# Altium PCB PCB1.PcbDoc (part 1 of 3)
Units mm, origin at the board's own origin, x right, y up, seen from the top; angles counter-clockwise.
Board outline 115 x 52 mm, 2 copper layers (Top Layer, Bottom Layer); 184 components, 116 nets, 555 pads, 115 vias.
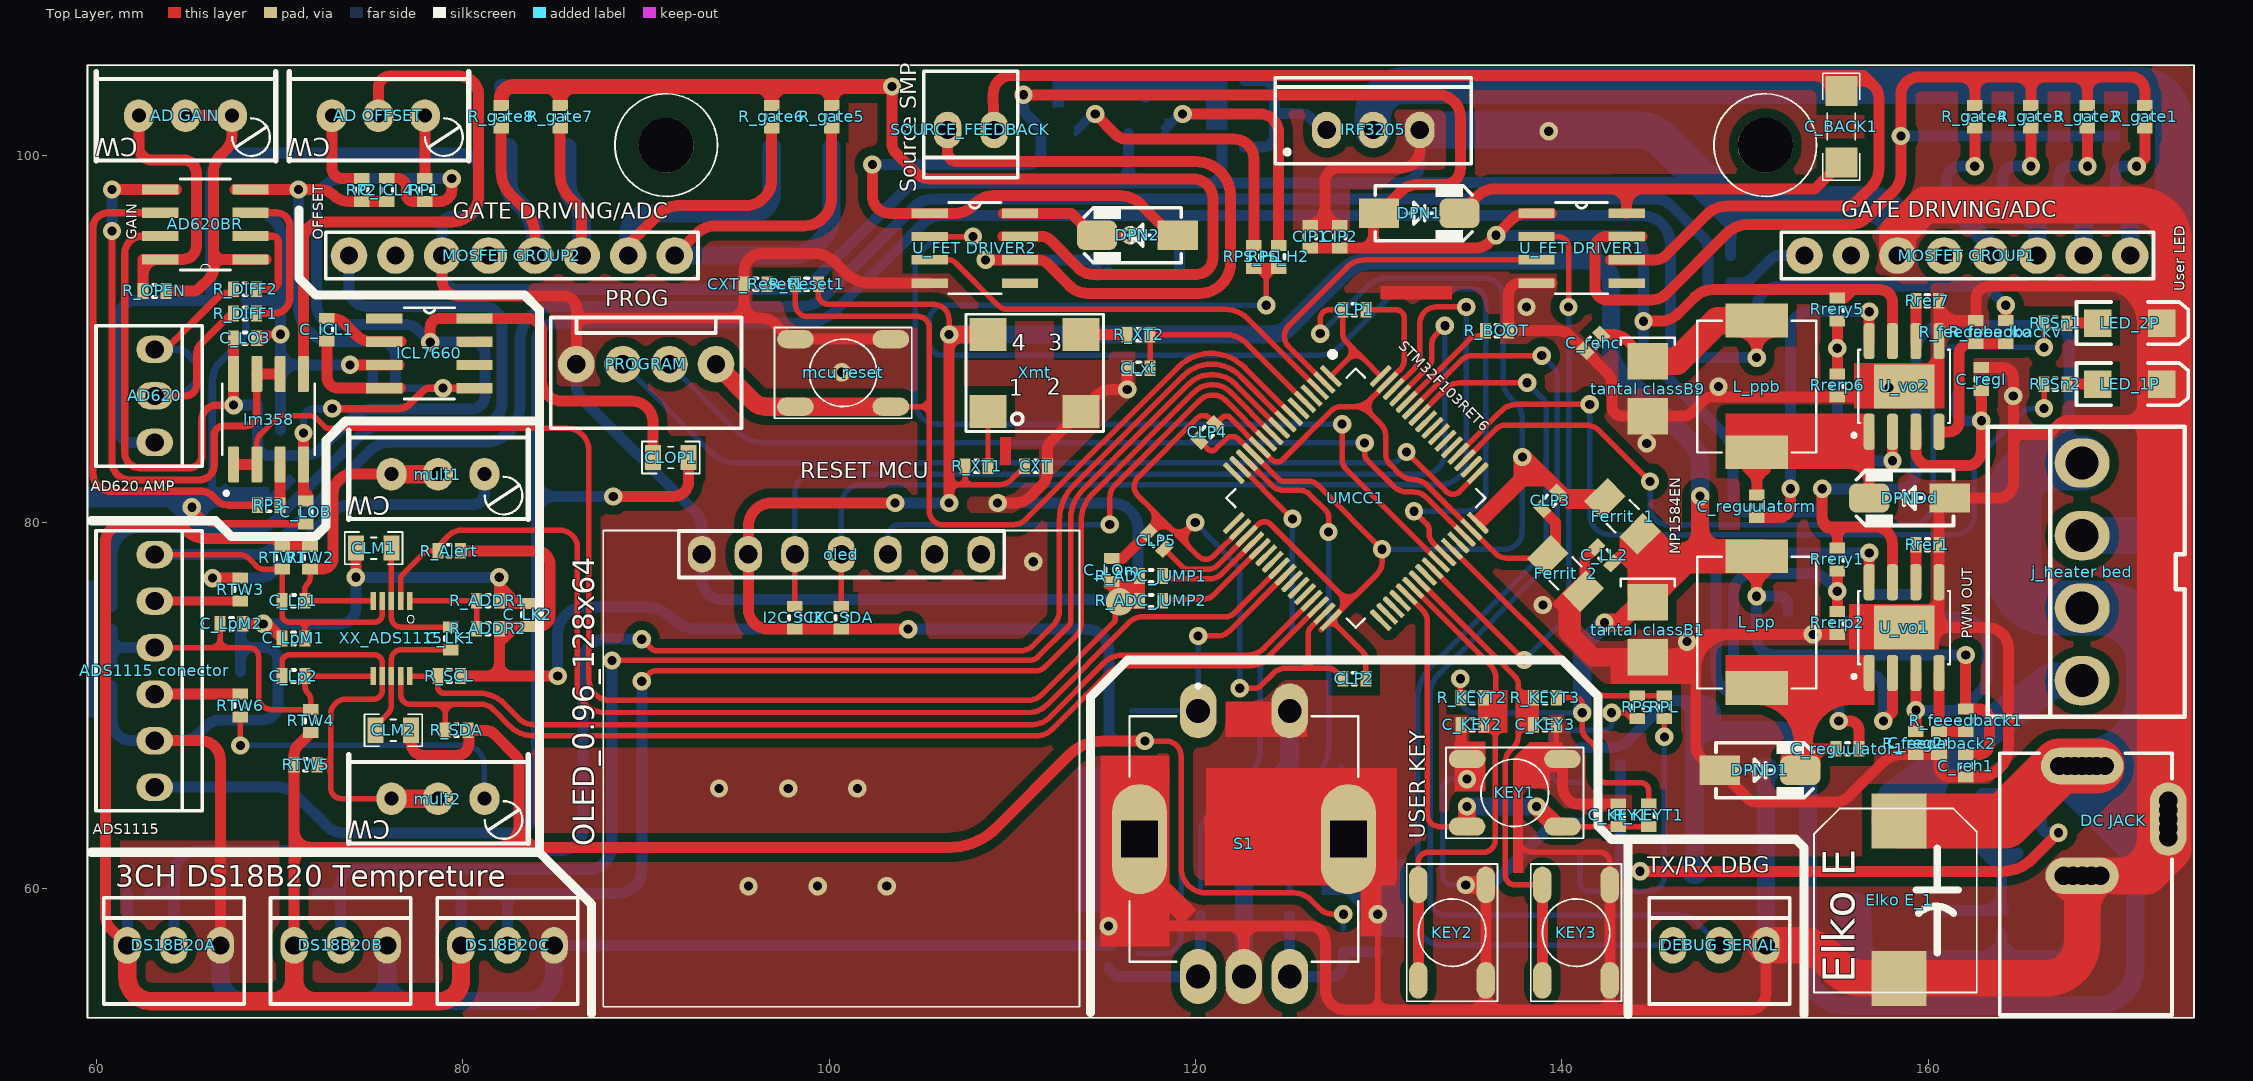
[diagram p0: Top Layer view]
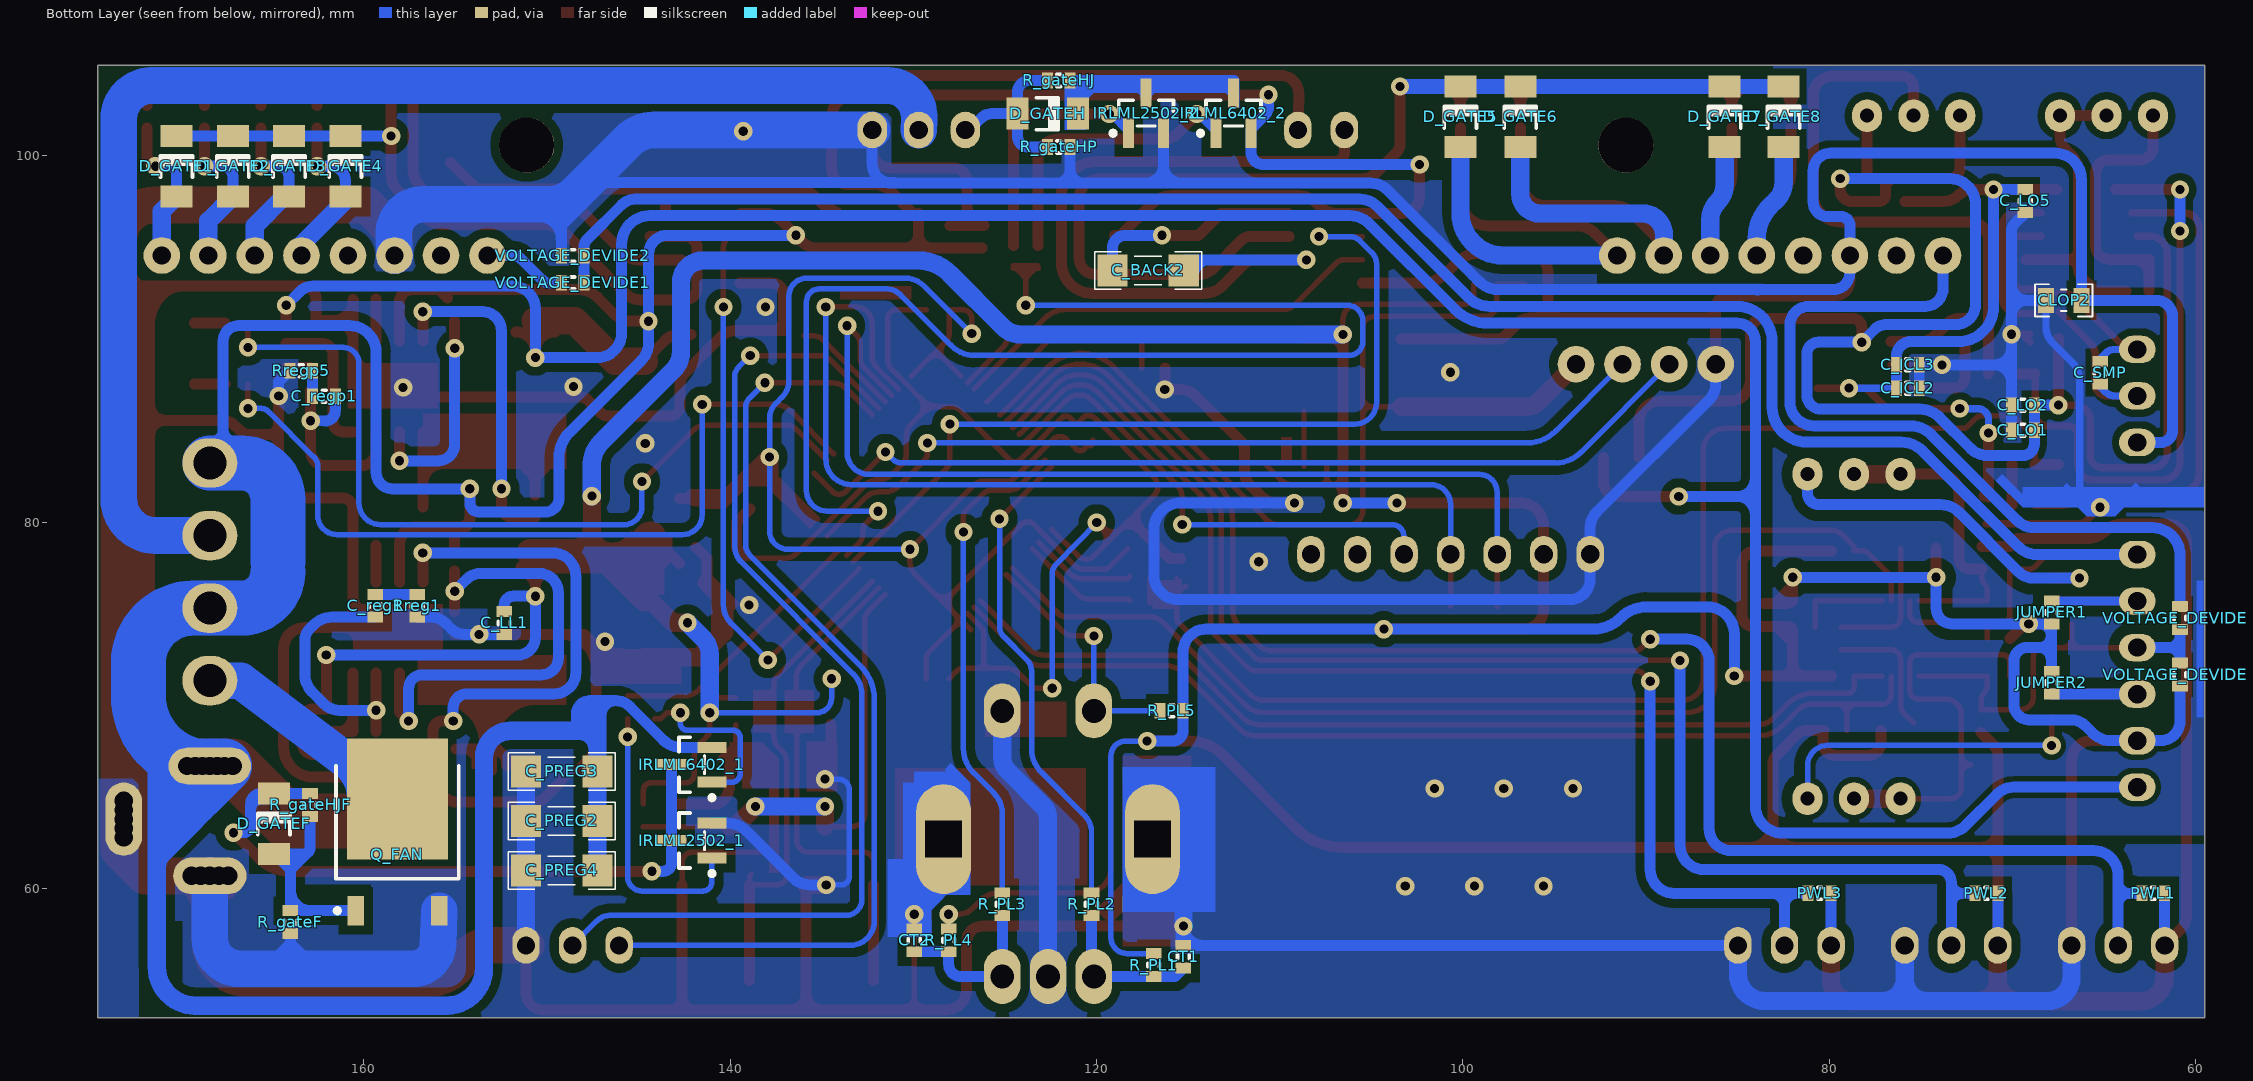
[diagram p1: Bottom Layer view, seen from below]
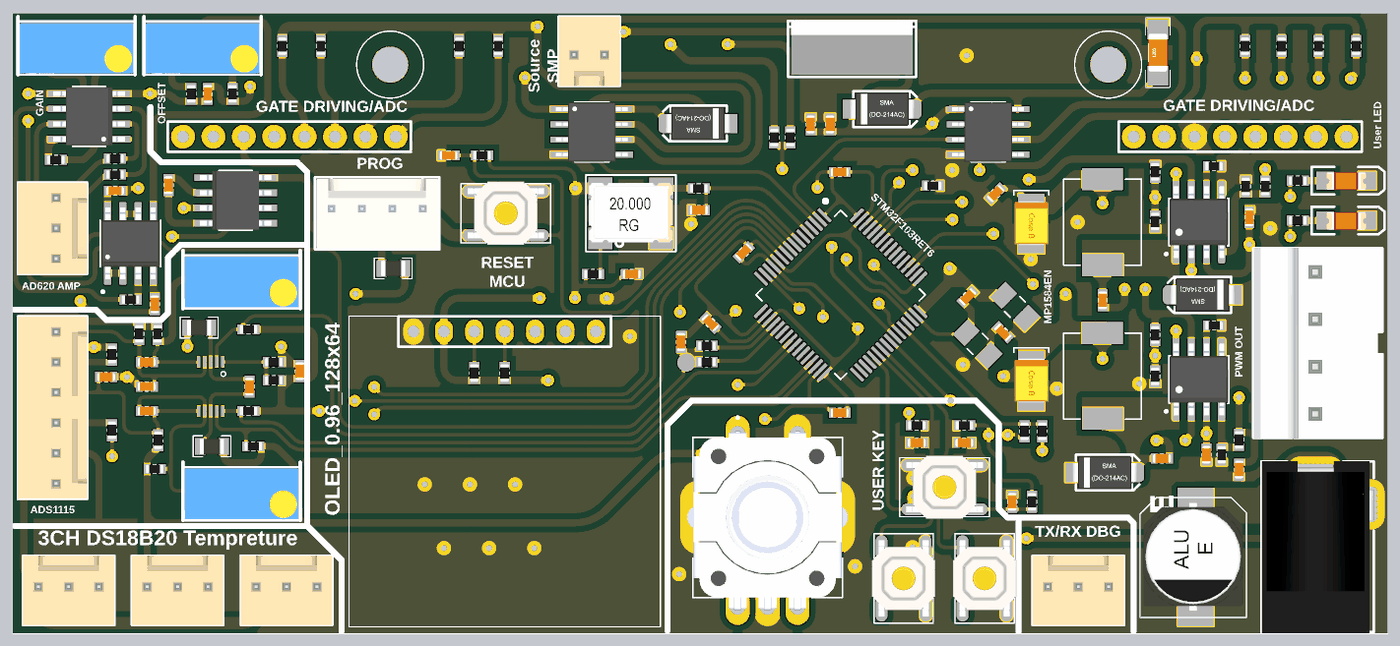
[diagram p4: 3D render of the assembled board from above, using the file's embedded part models]
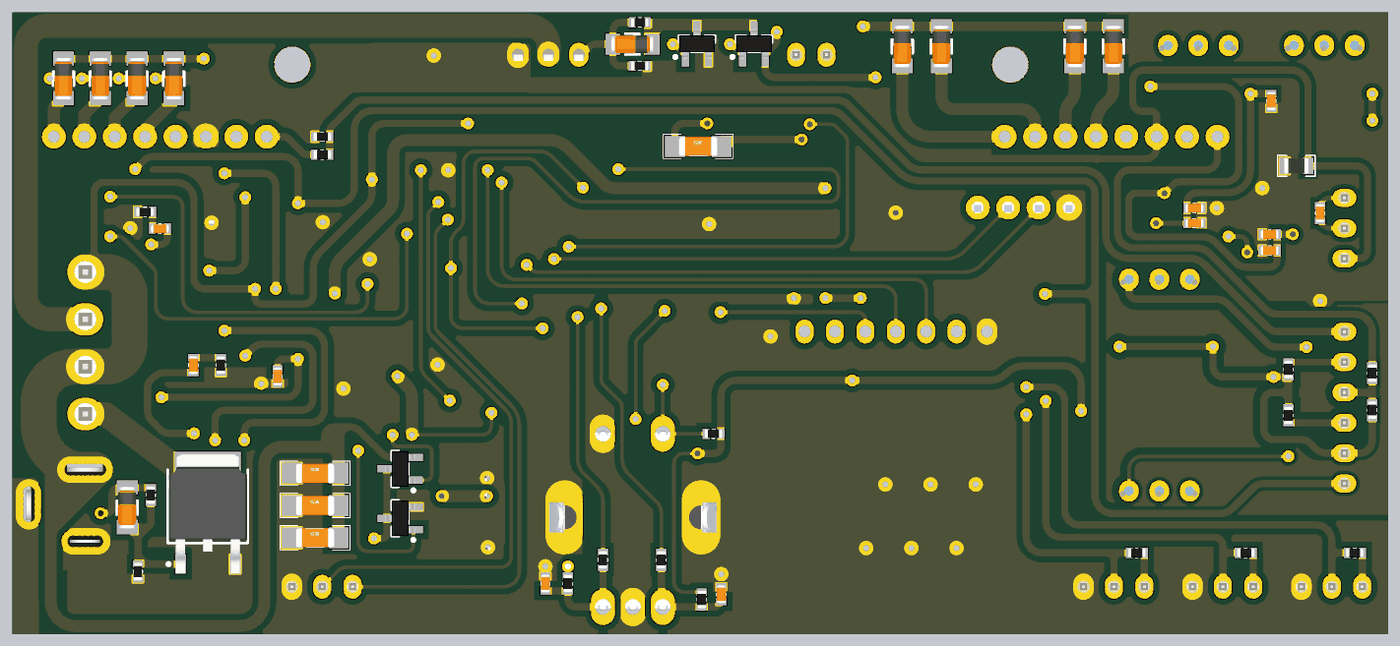
[diagram p5: 3D render of the assembled board from below, using the file's embedded part models]

## Layer stack, top to bottom
Top Solder: solder mask 0.0102, Solder Resist, Dk 3.5
Top Layer: signal copper 0.0356
Dielectric 1: dielectric 0.32, FR-4, Dk 4.8
Bottom Layer: signal copper 0.0356
Bottom Solder: solder mask 0.0102, Solder Resist, Dk 3.5

## Board outline
59.511,52.954 59.511,104.954 174.511,104.954 174.511,52.954

## Design rules (kind name [scope] priority, off if disabled: settings)
Clearance [All] p1: gap=0.1 ignorepadtopadclearanceinfootprint=FALSE
PolygonConnect [All] p1: connectstyle=Direct reliefconductorwidth=0.254 reliefentries=4 polygonreliefangle="90 Angle" airgapwidth=0.254
RoutingVias [All] p1: holewidth=0.5 width=1 viastyle="Through Hole" minholewidth=0.5 minwidth=1 maxholewidth=0.5 maxwidth=1
SolderMaskExpansion [All] p1: expansion=0.102 istentingtop=FALSE
Width [All] p1: maxlimit=3 minlimit=0.254 preferedwidth=0.5
30 further rules are at their usual default settings.

## Components (designator, comment, footprint, x,y, rotation, side; value= is the part's Value field where it differs from the comment)
AD620 "BUILER" 61900311121 63.179,86.9 r270 top
AD620BR "AD620BR" SOIC127P600X175-8N#1 65.95,96.26 r180 top
"AD GAIN" "100K" "Multi Turn" 64.86,102.2 r270 top
"AD OFFSET" "10K" "Multi Turn" 75.39,102.2 r270 top
"ADS1115 conector" "61900611121" 61900611121 63.179,71.894 r270 top
C_BACK1 "1uF" CAPC4817X12N 155.25,101.6 r90 top
C_BACK2 "1uF" CAPC4817X12N 117.18,93.75 r180 bottom
C_ICL1 "100nf" SMD_CAP_0603 72.58,90.513 r90 top value=10uF
C_ICL2 "100nf" SMD_CAP_0603 75.707,87.325 r180 bottom value=100nF
C_ICL3 "100nf" SMD_CAP_0603 75.707,88.595 r180 bottom value=10uF
C_ICL4 "100nf" SMD_CAP_0603 75.86,98.141 r270 top value=100nF
C_KEY1 "100nf" SMD_CAP_0603 143.08,64.016 r90 top value=100nF
C_KEY2 "100nf" SMD_CAP_0603 135.11,68.96 r180 top value=100nF
C_KEY3 "100nf" SMD_CAP_0603 139.078,68.96 r0 top value=100nF
C_LK1 "100nf" SMD_CAP_0603 79.344,73.661 r270 top value=100nF
C_LK2 "100nf" SMD_CAP_0603 83.55,74.948 r270 top value=100nF
C_LL1 "100nf" SMD_CAP_0603 152.33,74.508 r270 bottom value=100nF
C_LL2 "100nf" SMD_CAP_0603 142.31,78.2 r135 top value=1uF
C_LO1 "100nf" SMD_CAP_0603 69.428,85.039 r0 bottom value=100nF
C_LO2 "100nf" SMD_CAP_0603 69.428,86.399 r0 bottom value=10uF
C_LO3 "100nf" SMD_CAP_0603 68.112,90.04 r0 top value=10uF
C_LO5 "100nf" SMD_CAP_0603 69.295,97.543 r270 bottom value=100NF
C_LOB "100nf" SMD_CAP_0603 71.43,80.544 r270 top value=100nF
C_LOm "100nf" SMD_CAP_0603 115.414,77.394 r90 top value=100nF
C_Lp1 "100nf" SMD_CAP_0603 70.758,75.711 r0 top value=100nF
C_Lp2 "100nf" SMD_CAP_0603 70.758,71.611 r180 top value=100nF
C_LpM1 "100nf" SMD_CAP_0603 70.758,73.66 r0 top value=100nF
C_LpM2 "100nf" SMD_CAP_0603 67.37,74.46 r180 top value=100nF
C_PREG2 "10uF" CAPC4817X12N 149.19,63.7 r180 bottom
C_PREG3 "1uF" CAPC4817X12N 149.19,66.4 r180 bottom
C_PREG4 "100nF" CAPC4817X12N 149.19,61 r180 bottom
C_reg1 "100nf" SMD_CAP_0603 159.37,75.45 r90 bottom value=220pf
C_reg2 "NS" SMD_CAP_0603 159.315,67.954 r270 top
C_regl "NS" SMD_CAP_0603 162.899,87.82 r90 top
C_regp1 "100nf" SMD_CAP_0603 162.16,86.88 r0 bottom value=220pf
C_reguulator1 "22uf/6.3v" SMD_CAP_0603 155.591,67.638 r0 top value=100nf
C_reguulatorm "22uf/6.3v" SMD_CAP_0603 150.64,80.881 r270 top value=100nf
C_reh1 "22uf/6.3v" SMD_CAP_0603 162.04,66.71 r270 top
C_rehc "22uf/6.3v" SMD_CAP_0603 141.7,89.81 r225 top
C_SMP "10nf" SMD_CAP_0603 65.208,88.17 r90 bottom value=10nF
CIP1 "100nf" SMD_CAP_0603 126.25,95.592 r90 top value=100nF
CIP2 "100nf" SMD_CAP_0603 127.86,95.592 r90 top value=100nF
CLM1 "10uH" IND0805 75.134,78.59 r180 top value=1u
CLM2 "10uH" IND0805 76.21,68.65 r0 top value=1u
CLOP1 "10uH" IND0805 91.36,83.54 r0 top value=1u
CLOP2 "10uH" IND0805 67.2,92.12 r180 bottom value=1u
CLP1 "100nf" SMD_CAP_0603 128.67,91.61 r0 top value=100nF
CLP2 "100nf" SMD_CAP_0603 128.67,71.46 r180 top value=100nF
CLP3 "100nf" SMD_CAP_0603 139.359,81.173 r225 top value=100nF
CLP4 "100nf" SMD_CAP_0603 120.65,84.91 r45 top value=100nF
CLP5 "100nf" SMD_CAP_0603 117.86,78.99 r135 top value=100nF
CLxt "100nf" SMD_CAP_0603 116.892,88.414 r180 top value=10pF
CT1 "100nf" SMD_CAP_0603 115.25,56.283 r90 bottom value=100nF
CT2 "100nf" SMD_CAP_0603 129.95,57.182 r270 bottom value=100nF
CXT "100nf" SMD_CAP_0603 111.288,83.06 r0 top value=100nF
CXT_Reset1 "100nf" SMD_CAP_0603 95.984,93 r180 top value=100nF
D_GATE1 "1N4148" "Diode 1n4148 SMD" 170.219,97.79 r90 bottom
D_GATE2 "1N4148" "Diode 1n4148 SMD" 167.145,97.79 r90 bottom
D_GATE3 "1N4148" "Diode 1n4148 SMD" 164.072,97.79 r90 bottom
D_GATE4 "1N4148" "Diode 1n4148 SMD" 160.999,97.79 r90 bottom
D_GATE5 "1N4148" "Diode 1n4148 SMD" 100.13,100.49 r90 bottom
D_GATE6 "1N4148" "Diode 1n4148 SMD" 96.86,100.49 r90 bottom
D_GATE7 "1N4148" "Diode 1n4148 SMD" 85.71,100.49 r90 bottom
D_GATE8 "1N4148" "Diode 1n4148 SMD" 82.49,100.49 r90 bottom
D_GATEF "1N4148" "Diode 1n4148 SMD" 164.9,61.9 r90 bottom
D_GATEH "1N4148" "Diode 1n4148 SMD" 124.31,102.308 r180 bottom
"DC JACK" "DC Power Jack" "DC Power Jack 1" 167.6,66.7 r90 top
"DEBUG SERIAL" "BUILER" 61900311121 148.6,56.906 r0 top
DPN1 "1N5819" 430X270D 132.21,96.87 r0 top
DPN2 "1N5819" 430X270D 116.82,95.67 r180 top
DPND1 "1N5819" 430X270D 150.81,66.46 r0 top
DPNDd "1N5819" 430X270D 158.975,81.33 r180 top
DS18B20A "HEATSINK1" 61900311121 64.231,56.906 r0 top
DS18B20B "HEATSINK2" 61900311121 73.336,56.906 r0 top
DS18B20C "BUILER" 61900311121 82.441,56.906 r0 top
"Elko E_1" "Elko E package" "Elko E" 158.2,56.5 r90 top
"Ferrit  1" "BLM31PG601SH1L" BEADC3216X130N 143.312,80.328 r315 top
"Ferrit  2" "BLM31PG601SH1L" BEADC3216X130N 140.196,77.212 r315 top
"I2C SCK" "4.7K" "RES 0603 (1608X06L)" 98.13,75.417 r270 top
"I2C SDA" "4.7K" "RES 0603 (1608X06L)" 100.67,75.417 r270 top
ICL7660 "ICL7660CBAZ" SOIC127P600X175-8N#2 78.18,89.23 r0 top
IRF3205 "IRF740" "TO-220 AB" 129.7,101.418 r0 top
IRLML2502_1 "BC337" SOT23_M 142.09,62.63 r0 bottom
IRLML2502_2 "BC337" SOT23_M 117.29,102.34 r90 bottom
IRLML6402_1 "BC856" SOT23_M 142.09,66.77 r0 bottom
IRLML6402_2 "BC856" SOT23_M 112.52,102.34 r90 bottom
"j_heater bed" "" 645004114822 168.4,77.3 r90 top
JUMPER1 "0R" "RES 0603 (1608X06L)" 67.86,74.46 r90 bottom
JUMPER2 "0R" "RES 0603 (1608X06L)" 67.86,71.869 r270 bottom
KEY1 "RTC_PWR" push_bt 140.029,63.394 r180 top
KEY2 "RTC_PWR" push_bt 132.161,55 r90 top
KEY3 "RTC_PWR" push_bt 138.929,55 r90 top
L_pp "10uH" IND_SRP6540-4R7M#1 150.63,74.53 r90 top
L_ppb "10uH" IND_SRP6540-4R7M#2 150.63,87.41 r90 top
LED_1P "" "LED SMD 1206" 170.99,87.55 r0 top
LED_2P "" "LED SMD 1206" 170.99,90.88 r0 top
lm358 "LM358D" SOIC127P599X175-8N 69.395,85.63 r90 top
"mcu reset" "RTC_PWR" push_bt 103.367,86.317 r180 top
"MOSFET GROUP1" "Header 8" HDR1X8 171.019,94.564 r180 top
"MOSFET GROUP2" "Header 8" HDR1X8 91.569,94.564 r180 top
mult1 "500 ohm" "Multi Turn" 78.644,82.63 r270 top
mult2 "500 ohm" "Multi Turn" 78.644,64.92 r270 top
oled "Header 7" HDR1X7 93.05,78.26 r0 top
PROGRAM "HDR_STEPER MOTOR" "CON WF_4" 90.01,88.635 r180 top
PWL1 "4.7K" "RES 0603 (1608X06L)" 61.691,59.746 r0 bottom
PWL2 "4.7K" "RES 0603 (1608X06L)" 70.796,59.746 r0 bottom
PWL3 "4.7K" "RES 0603 (1608X06L)" 79.901,59.746 r0 bottom
Q_FAN "FDD6690A" TO252-3L 158.16,63.1 r90 bottom
R_ADC_JUMP1 "10R" "RES 0603 (1608X06L)" 116.946,77.07 r0 top
R_ADC_JUMP2 "10R" "RES 0603 (1608X06L)" 116.946,75.71 r0 top
R_ADDR1 "4.7K" "RES 0603 (1608X06L)" 81.994,75.711 r180 top
R_ADDR2 "4.7K" "RES 0603 (1608X06L)" 81.994,74.18 r180 top
R_Alert "10K" "RES 0603 (1608X06L)" 78.639,78.444 r0 top
R_BOOT "10K" "RES 0603 (1608X06L)" 135.83,90.46 r0 top
R_DIFF1 "1K" "RES 0603 (1608X06L)" 67.49,91.4 r0 top
R_DIFF2 "1K" "RES 0603 (1608X06L)" 67.49,92.73 r0 top
R_feedaback2 "40.2K" "RES 0603 (1608X06L)" 160.585,68.576 r270 top
R_feedabacko "40.2K" "RES 0603 (1608X06L)" 162.599,89.771 r90 top
R_feeedback1 "124K" "RES 0603 (1608X06L)" 162.04,69.821 r270 top
R_feeedbackv "124K" "RES 0603 (1608X06L)" 164.229,91.015 r270 top
R_gate1 "10R" "RES 0603 (1608X06L)" 171.819,101.518 r90 top
R_gate2 "10R" "RES 0603 (1608X06L)" 168.685,101.518 r90 top
R_gate3 "10R" "RES 0603 (1608X06L)" 165.602,101.518 r90 top
R_gate4 "10R" "RES 0603 (1608X06L)" 162.539,101.518 r90 top
R_gate5 "10R" "RES 0603 (1608X06L)" 100.13,101.518 r90 top
R_gate6 "10R" "RES 0603 (1608X06L)" 96.86,101.518 r90 top
R_gate7 "10R" "RES 0603 (1608X06L)" 85.31,101.518 r90 top
R_gate8 "10R" "RES 0603 (1608X06L)" 82.09,101.518 r90 top
R_gateF "10K" "RES 0603 (1608X06L)" 164,58.8 r270 bottom
R_gateHJ "10R" "RES 0603 (1608X06L)" 122.682,104.12 r180 bottom
R_gateHJF "10R" "RES 0603 (1608X06L)" 162.93,63.956 r90 bottom
R_gateHP "10K" "RES 0603 (1608X06L)" 122.682,100.49 r180 bottom
R_KEYT1 "4.7K" "RES 0603 (1608X06L)" 144.73,63.394 r90 top
R_KEYT2 "4.7K" "RES 0603 (1608X06L)" 135.732,70.42 r180 top
R_KEYT3 "4.7K" "RES 0603 (1608X06L)" 138.456,70.42 r0 top
R_OPEN "?" "RES 0603 (1608X06L)" 62.546,92.63 r0 top
R_PL1 "4.7K" "RES 0603 (1608X06L)" 116.88,56.454 r270 bottom
R_PL2 "4.7K" "RES 0603 (1608X06L)" 120.27,58.536 r90 bottom
R_PL3 "4.7K" "RES 0603 (1608X06L)" 125.14,58.536 r90 bottom
R_PL4 "4.7K" "RES 0603 (1608X06L)" 128.07,57.804 r270 bottom
R_PL5 "4.7K" "RES 0603 (1608X06L)" 115.276,69.71 r0 bottom
R_Reset1 "4.7K" "RES 0603 (1608X06L)" 98.16,93 r0 top
R_SCL "4.7K" "RES 0603 (1608X06L)" 79.883,71.611 r180 top
R_SDA "4.7K" "RES 0603 (1608X06L)" 80.283,68.65 r180 top
R_XT1 "10k" "RES 0603 (1608X06L)" 107.426,83.06 r0 top
R_XT2 "100R" "RES 0603 (1608X06L)" 116.27,90.25 r0 top
RP1 "1K" "RES 0603 (1608X06L)" 77.93,98.763 r270 top
RP2 "1K" "RES 0603 (1608X06L)" 74.479,98.763 r270 top
RP3 "1K" "RES 0603 (1608X06L)" 70.03,80.935 r180 top
RPL "1K" "RES 0603 (1608X06L)" 145.59,70.53 r270 top
RPS "1K" "RES 0603 (1608X06L)" 144.11,70.53 r270 top
RPS_H1 "1K" "RES 0603 (1608X06L)" 123.188,93.87 r90 top
RPS_H2 "1K" "RES 0603 (1608X06L)" 124.53,93.87 r90 top
RPSn1 "1K" "RES 0603 (1608X06L)" 167.56,90.88 r180 top
RPSn2 "1K" "RES 0603 (1608X06L)" 167.56,87.55 r180 top
Rreg1 "68.1K" "RES 0603 (1608X06L)" 157.07,76.072 r270 bottom
Rregp5 "68.1K" "RES 0603 (1608X06L)" 162.782,88.28 r0 bottom
Rrer1 "200K" "RES 0603 (1608X06L)" 159.331,78.77 r0 top
Rrer7 "200K" "RES 0603 (1608X06L)" 159.325,92.1 r0 top
Rrerp2 "24.9K" "RES 0603 (1608X06L)" 155.03,73.886 r90 top
Rrerp6 "24.9K" "RES 0603 (1608X06L)" 155.03,86.856 r90 top
Rrery1 "100K" "RES 0603 (1608X06L)" 155.03,78.594 r270 top
Rrery5 "100K" "RES 0603 (1608X06L)" 155.03,92.244 r270 top
RTW1 "1K" "RES 0603 (1608X06L)" 70.136,78.685 r270 top
RTW2 "1K" "RES 0603 (1608X06L)" 71.66,77.441 r90 top
RTW3 "820R" "RES 0603 (1608X06L)" 67.86,76.955 r270 top
RTW4 "1K" "RES 0603 (1608X06L)" 71.71,68.536 r90 top
RTW5 "1K" "RES 0603 (1608X06L)" 72.04,66.76 r180 top
RTW6 "820R" "RES 0603 (1608X06L)" 67.86,69.38 r90 top
S1 "PEC11R-4220K-S0024" XDCR_PEC11R-4220K-S0024 122.64,62.71 r0 top
SOURCE_FEEDBACK "61900211121" 61900211121 107.73,101.418 r180 top
"tantal classB1" "100uf/16" "TANTAL-CAP-Size B" 144.68,74.135 r270 top
"tantal classB9" "100uf/16" "TANTAL-CAP-Size B" 144.68,87.3 r270 top
"U_FET DRIVER1" "IR2104STRPBF" SOIC127P600X175-8N#3 141.07,94.965 r0 top
"U_FET DRIVER2" "IR2104STRPBF" SOIC127P600X175-8N#3 107.95,94.965 r0 top
U_vo1 "MP1584EN" SOIC127P600X170-9N 158.68,74.255 r90 top
U_vo2 "MP1584EN" SOIC127P600X170-9N 158.68,87.42 r90 top
UMCC1 "STM32F103RET6" QFP50P1200X1200X160-64N 128.749,81.325 r315 top
VOLTAGE_DEVIDE1 "?R" "RES 0603 (1608X06L)" 149.214,93.07 r180 bottom
VOLTAGE_DEVIDE2 "?R" "RES 0603 (1608X06L)" 149.214,94.564 r180 bottom
VOLTAGE_DEVIDE3 "?R" "RES 0603 (1608X06L)" 60.85,75.4 r270 bottom
VOLTAGE_DEVIDE4 "?R" "RES 0603 (1608X06L)" 60.85,71.066 r90 bottom
Xmt "NZ2520SB-25.00M" VCO 108.67,86.059 r0 top
XX_ADS1115 "XX_ADS1115" MSOP10 76.104,73.661 r180 top

## Footprints (in the part's own frame and the unit in brackets; to place one, negate y for a bottom-side part, rotate by r counter-clockwise, add the part's x,y. Pads: shape width x height; smd on the part's side, far side on the other; paste and mask are expansions set on the pad)
430X270D [mm] "SMA Molded Diode, 2-Leads, Body 4.3x2.7mm"
  rect 2.2x1.6 smd: 1(-2.2,0)
  rrect50% 2.2x1.6 smd: 2(2.2,0)
  silkscreen extent -2.4,-1.5 2.9,1.5, body extent -2.75,-1.4 2.75,1.4, height 2.6
61900211121 [mm] "2.54mm Male Locking Header, 2p"
  oval 1.5x2 hole 1: 1(1.27,0) 2(-1.27,0)
  silkscreen extent -2.56,-3.2 2.56,2.6, body extent -2.54,-3.2 2.54,2.6, height 11.55
61900311121 [mm] "2.54mm Male Locking Header, 3p"
  oval 1.5x2 hole 1: 1(2.54,0) 2(0,0) 3(-2.54,0)
  silkscreen extent -3.83,-3.2 3.83,2.6, body extent -3.81,-3.2 3.81,2.6, height 11.55
61900611121 [mm] "2.54mm Male Locking Header, 6p"
  oval 1.5x2 hole 1: 1(6.35,0) 2(3.81,0) 3(1.27,0) 4(-1.27,0) 5(-3.81,0) 6(-6.35,0)
  silkscreen extent -7.64,-3.2 7.64,2.6, body extent -7.62,-3.2 7.62,2.6, height 11.55
645004114822 [mm] "3.96mm Male Locking Header, 4p"
  oval 2.7x3 hole 1.8: 1(5.94,0) 2(1.98,0) 3(-1.98,0) 4(-5.94,0)
  silkscreen extent -7.92,-5.6 7.92,5.15, body extent -7.98,-5.6 7.98,5.15, height 13.95
BEADC3216X130N [mm]
  rect 1.4x1.82 smd: 1(-1.36,0) 2(1.36,0)
  silkscreen extent -0.34,-0.9 0.34,0.9
CAPC4817X12N [mm] "Chip Capacitor, 2-Leads, Body 4/80x1/70mm, IPC Medium Density-Design:Abbas Basereh"
  rect 1.65x1.75 smd: 1(-1.95,0) 2(1.95,0)
  silkscreen extent -2.92,-1.02 2.92,1.02, body extent -1.6,-0.8 1.6,0.8, height 1
"CON WF_4" [mm] "DS1070  WF, Cvilux CI31 pitch 2.54mm-Designer Abbas Basereh"
  round 2 hole 1: 1(-3.81,0) 2(-1.27,0) 3(1.27,0) 4(3.81,0)
  silkscreen extent -5.2,-2.55 5.2,3.5, body extent -5.08,-2.4 5.08,3.4, height 11.56
"DC Power Jack 1" [mm] "Power Adaptor Jack"
  round 1.5 hole 1: 1(0,0.45) 1(0,0) 1(0,-0.4) 1(0,-1.2) 1(0,-1.6) 1(0,-2.05) 2(-6,-1.8) 2(-6,0.2) 2(-6,-1.3) 2(-6,-0.3) 3(-3.9,-5.5) 3(-3.4,-5.5) 3(-2.4,-5.5) 3(-1.9,-5.5)
  oval 2x4.5 hole 1: 1(0,-0.8)
  oval 2x4 hole 1: 2(-6,-0.8)
  oval 4x2 hole 1: 3(-2.9,-5.5)
  silkscreen extent -13.59,-5.7 0.7,3.7, body extent -13.68,-5.74 0.72,3.66, height 11.05
"Diode 1n4148 SMD" [mm] "Mini MELF SOD-80"
  rect 1.2x1.75 smd: 1(0,0) 2(3.3,0)
  silkscreen extent 1.04,-0.88 2.22,0.87, body extent -0.13,-0.75 3.37,0.75, height 1.55
"Elko E" [mm]
  rect 3x3 smd: 1(-1.395,-0.21) 2(7.2,-0.2)
  silkscreen extent -2.16,-4.44 7.87,4.45, body extent -1.58,-4.15 7.42,4.15, height 6.2
HDR1X7 [mm] "Connector; Header; 7 Position"
  oval 1.5x2 hole 1: 1(0,0) 2(2.54,0) 3(5.08,0) 4(7.62,0) 5(10.16,0) 6(12.7,0) 7(15.24,0)
  silkscreen extent -1.27,-1.27 16.51,1.27
HDR1X8 [mm] "Connector; Header; 8 Position"
  round 2 hole 1: 1(0,0) 2(2.54,0) 3(5.08,0) 4(7.62,0) 5(10.16,0) 6(12.7,0) 7(15.24,0) 8(17.78,0)
  silkscreen extent -1.27,-1.27 19.05,1.27
IND0805 [mm] "Chip Inductor, 2-Leads, Body 2/00x1/25mm, IPC Medium Density DESIGNER:ABBAS BASEREH"
  rect 0.87x1.37 smd: 1(-0.97,0) 2(0.97,0)
  silkscreen extent -1.58,-0.87 1.58,0.87, body extent -1.02,-0.65 1.02,0.65, height 0.5
IND_SRP6540-4R7M#1 [mm]
  rect 1.85x3.4 smd: 1(-3.57,-0.01) 2(3.62,0)
  silkscreen extent -3.6,-3.25 3.6,3.25
IND_SRP6540-4R7M#2 [mm]
  rect 1.85x3.4 smd: 1(-3.585,0) 2(3.605,0)
  silkscreen extent -3.6,-3.25 3.6,3.25
"LED SMD 1206" [mm]
  rect 1.5x1.5 smd: 1(-1.75,0) 2(1.75,0)
  silkscreen extent -2.9,-1.15 3.2,1.15, body extent -1.65,-0.76 1.65,0.69, height 1.36
MSOP10 [mm]
  rect 0.3x1 smd paste-1 mask+0: 1(-1,-2.05) 2(-0.5,-2.05) 3(0,-2.05) 4(0.5,-2.05) 5(1,-2.05) 6(1,2.05) 7(0.5,2.05) 8(0,2.05) 9(-0.5,2.05) 10(-1,2.05)
  silkscreen extent -1.25,-1.25 -0.85,-0.85
"Multi Turn" [mil]
  oval 70x65 hole 30: 1(0,100) 2(0,0) 3(0,-100)
  silkscreen extent -94,-191 96,194, body extent -73,-185 93,189, height 452
push_bt [mm]
  oval 2x1 smd: 1(0,0) 2(0,-3.683) 3(5.207,0) 4(5.207,-3.683)
  silkscreen extent -1.14,-4.32 6.35,0.64, body extent -0.6,-4.49 5.8,0.81, height 1.5
QFP50P1200X1200X160-64N [mm]
  rrect50% 1.49x0.28 smd: 1(-5.67,3.75) 2(-5.67,3.25) 3(-5.67,2.75) 4(-5.67,2.25) 5(-5.67,1.75) 6(-5.67,1.25) 7(-5.67,0.75) 8(-5.67,0.25) 9(-5.67,-0.25) 10(-5.67,-0.75) 11(-5.67,-1.25) 12(-5.67,-1.75) 13(-5.67,-2.25) 14(-5.67,-2.75) 15(-5.67,-3.25) 16(-5.67,-3.75) 33(5.67,-3.75) 34(5.67,-3.25) 35(5.67,-2.75) 36(5.67,-2.25) 37(5.67,-1.75) 38(5.67,-1.25) 39(5.67,-0.75) 40(5.67,-0.25) 41(5.67,0.25) 42(5.67,0.75) 43(5.67,1.25) 44(5.67,1.75) 45(5.67,2.25) 46(5.67,2.75) 47(5.67,3.25) 48(5.67,3.75)
  rrect50% 0.28x1.49 smd: 17(-3.75,-5.67) 18(-3.25,-5.67) 19(-2.75,-5.67) 20(-2.25,-5.67) 21(-1.75,-5.67) 22(-1.25,-5.67) 23(-0.75,-5.67) 24(-0.25,-5.67) 25(0.25,-5.67) 26(0.75,-5.67) 27(1.25,-5.67) 28(1.75,-5.67) 29(2.25,-5.67) 30(2.75,-5.67) 31(3.25,-5.67) 32(3.75,-5.67) 49(3.75,5.67) 50(3.25,5.67) 51(2.75,5.67) 52(2.25,5.67) 53(1.75,5.67) 54(1.25,5.67) 55(0.75,5.67) 56(0.25,5.67) 57(-0.25,5.67) 58(-0.75,5.67) 59(-1.25,5.67) 60(-1.75,5.67) 61(-2.25,5.67) 62(-2.75,5.67) 63(-3.25,5.67) 64(-3.75,5.67)
  silkscreen extent -6.6,-5 5,5
"RES 0603 (1608X06L)" [mm] "Chip Resistor, 2-Leads, Body 1.6x0.8mm, IPC High Density _ (0.063W)"
  rect 0.6x0.85 smd: 1(0,0) 2(1.244,0)
  silkscreen extent 0.52,-0.33 0.72,0.33, body extent -0.14,-0.38 1.38,0.38, height 0.45
SMD_CAP_0603 [mm]
  rect 0.6x0.85 smd: 1(-0.622,0) 2(0.622,0)
  silkscreen extent -0.1,-0.33 0.1,0.33, body extent -0.76,-0.38 0.76,0.38, height 0.6
SOIC127P599X175-8N [mm]
  rrect25% 1.97x0.6 smd: 1(-2.47,1.905) 2(-2.47,0.635) 3(-2.47,-0.635) 4(-2.47,-1.905) 5(2.47,-1.905) 6(2.47,-0.635) 7(2.47,0.635) 8(2.47,1.905)
  silkscreen extent -4.14,-2.52 1.95,2.52, body extent -3,-2.45 3,2.45, height 1.75
SOIC127P600X170-9N [mm]
  rrect54% 1.97x0.6 smd paste+0 mask+0.102: 1(-2.475,1.905) 2(-2.475,0.635) 3(-2.475,-0.635) 4(-2.475,-1.905) 5(2.475,-1.905) 6(2.475,-0.635) 7(2.475,0.635) 8(2.475,1.905)
  rect 2.41x3.3 smd paste-3 mask+0.102: 9(0,0)
  silkscreen extent -2.77,-2.5 2,2.84, body extent -3,-2.45 3,2.45, height 1.7
SOIC127P600X175-8N#1 [mil]
  rect 78x22 smd: 1(-97,75) 2(-97,25) 3(-97,-25) 4(-97,-75) 5(97,-75) 6(97,-25) 7(97,25) 8(97,75)
  silkscreen extent -54,-98 54,98, body extent -118,-96 118,96, height 69
SOIC127P600X175-8N#2 [mil]
  rect 78x22 smd paste+0 mask+4.02: 1(-97,75) 2(-97,25) 3(-97,-25) 4(-97,-75) 5(97,-75) 6(97,-25) 7(97,25) 8(97,75)
  silkscreen extent -54,-98 54,98, body extent -118,-96 118,96, height 69
SOIC127P600X175-8N#3 [mil]
  rect 78x20 smd: 1(-97,75) 2(-97,25) 3(-97,-25) 4(-97,-75) 5(97,-75) 6(97,-25) 7(97,25) 8(97,75)
  silkscreen extent -56,-98 56,98, body extent -118,-98 118,98, height 69
SOT23_M [mm] "SOT23, 3-Leads, Body 2.9x1.3mm, Pitch 0.95mm, Lead Span 2.3mm, IPC Low Density"
  rect 1.6x0.6 smd: 1(-1.1,0.95) 2(-1.1,-0.95) 3(1.1,0)
  silkscreen extent -1.22,-1.5 0.7,1.92, body extent -1.27,-1.5 1.27,1.5, height 1.1
"TANTAL-CAP-Size B" [mm] "Chip Capacitor, 2-Leads, Body 3.2x1.6mm, IPC High Density, chip Tantalum"
  rect 2x2.2 smd: 1(1.5,0) 2(-1.5,0)
  silkscreen extent -2.78,-1.47 -2.38,1.47, body extent -1.87,-1.39 1.82,1.43, height 1.74
TO252-3L [mm] "D-PAK, 3-Pads, Body 6.2x6.7mm (max), IPC High Density"
  rect 1.6x0.9 smd: 1(-4.3,2.28) 3(-4.3,-2.28)
  rect 6.6x5.5 smd: 4(1.8,0)
  silkscreen extent -4.42,-3.35 3.6,3.41, body extent -5.06,-3.27 4.88,3.27, height 2.39
"TO-220 AB" [mm] "Epoxy meets UL94, V0-Design:Abbas Basereh"
  oval 1.6x2 hole 1: 1(-2.54,0) 2(0,0) 3(2.54,0)
  silkscreen extent -5.35,-1.85 5.35,2.85, body extent -5.08,-1.65 5.08,2.92, height 18.54
VCO [mm]
  rect 2x1.8 smd: 1(0,0) 2(5.08,0) 3(5.08,4.191) 4(0,4.2)
  silkscreen extent -1.2,-1.1 6.3,5.3, body extent -0.96,-0.34 6.04,4.66, height 1.31
XDCR_PEC11R-4220K-S0024 [mm]
  oval 2x3 hole 1.3 mask+0.102: 1(-2.5,7) 2(2.5,7) A(-2.5,-7.5) B(2.5,-7.5) C(0,-7.5)
  oval 3x6 hole 2 square mask+0.102: SH1(-5.7,0) SH2(5.7,0)
  silkscreen extent -6.25,-6.7 6.25,8.45, body extent -7,-7.75 7,7.2, height 26.6

## Part data
AD620 "DEBUG SERIAL" DS18B20A DS18B20B DS18B20C: library part 61900311121, "WR-WTB 2.54mm Male Locking Header, 3p", ComponentLink1Description=Manufacturer, ComponentLink1URL=http://www.we-online.de, ComponentLink2Description=Datasheet, ComponentLink2URL=http://katalog.we-online.de/em/datasheet/6190xx11121.pdf, Part Number=61900311121, Pin Number=3, Pitch="2.54 mm", Published Date="June 2017", Publisher="Wurth Elektronik"
AD620BR: "Instrumentation Amplifier 1 Circuit - 8-SOIC", Package="SOIC-8 Analog Devices", Check_prices=https://www.snapeda.com/parts/AD620BR/Analog+Devices/view-part/?ref=eda, MF="Analog Devices", MP=AD620BR, SnapEDA_Link=https://www.snapeda.com/parts/AD620BR/Analog+Devices/view-part/?ref=snap
"AD GAIN" "AD OFFSET" mult1 mult2: library part "Resistor Variable", "Variable Resistor"
"ADS1115 conector": "WR-WTB 2.54mm Male Locking Header, 6p", ComponentLink1Description=Manufacturer, ComponentLink1URL=http://www.we-online.de, ComponentLink2Description=Datasheet, ComponentLink2URL=http://katalog.we-online.de/em/datasheet/6190xx11121.pdf, Part Number=61900611121, Pin Number=6, Pitch="2.54 mm", Published Date="June 2017", Publisher="Wurth Elektronik"
C_BACK1 C_BACK2 C_PREG2 C_PREG3 C_PREG4: library part "CAP SMD 1206", "CAP 1206", Data=16-12-2016, Desc.="CAP SMD 1206", Designer="Abbas Basereh"
C_ICL1 C_ICL2 C_ICL3 C_ICL4 C_KEY1 C_KEY2 C_KEY3 C_LK1 C_LK2 C_LL1 C_LL2 C_LO1 C_LO2 C_LO3 C_LO5 C_LOB C_LOm C_Lp1 C_Lp2 C_LpM1 C_LpM2 C_reg1 C_reg2 C_regl C_regp1 C_reguulator1 C_reguulatorm C_reh1 C_rehc C_SMP CIP1 CIP2 CLP1 CLP2 CLP3 CLP4 CLP5 CLxt CT1 CT2 CXT CXT_Reset1: library part Cap-Bipolar, "Bipolar Capacitor", Voltage=100V, Adding Date=1387/12/20, Designer="Saeid Jorablo", Organazation=ControTec
CLM1 CLM2 CLOP1 CLOP2: library part "INDUCTOR SMD PACKAGE", "TOTAL INDUCTOR SMD PACK", Data=2017-3-10, Desc.="INDUCTOR  SMD TOTAL PACKAGES", Designer="Abbas Basereh"
D_GATE1 D_GATE2 D_GATE3 D_GATE4 D_GATE5 D_GATE6 D_GATE7 D_GATE8 D_GATEF D_GATEH: library part "1N4148 SMD", "General Semicoductor"
"DC JACK": "DC Power Jack. Center Pin 2.5mm. Diameter: 5.7mm", Adding Date=10/21/2009, Company=Personal, Designer="Ali Hafizi", Project Name=Laser
DPN1 DPN2 DPND1 DPNDd: "Schottkey Rectifiers", Data=16-12-2016, Designer="Abbas Basereh"
"Ferrit  1" "Ferrit  2": "FERRITE BEAD 600 OHM 1206 1LN", Package=None, Availability=Unavailable, MP=BLM31PG601SH1L, PRICE=None
"I2C SCK" "I2C SDA" JUMPER1 JUMPER2 PWL1 PWL2 PWL3 R_ADC_JUMP1 R_ADC_JUMP2 R_ADDR1 R_ADDR2 R_Alert R_BOOT R_DIFF1 R_DIFF2 R_feedaback2 R_feedabacko R_feeedback1 R_feeedbackv R_gate1 R_gate2 R_gate3 R_gate4 R_gate5 R_gate6 R_gate7 R_gate8 R_gateF R_gateHJ R_gateHJF R_gateHP R_KEYT1 R_KEYT2 R_KEYT3 R_OPEN R_PL1 R_PL2 R_PL3 R_PL4 R_PL5 R_Reset1 R_SCL R_SDA R_XT1 R_XT2 RP1 RP2 RP3 RPL RPS RPS_H1 RPS_H2 RPSn1 RPSn2 Rreg1 Rregp5 Rrer1 Rrer7 Rrerp2 Rrerp6 Rrery1 Rrery5 RTW1 RTW2 RTW3 RTW4 RTW5 RTW6 VOLTAGE_DEVIDE1 VOLTAGE_DEVIDE2 VOLTAGE_DEVIDE3 VOLTAGE_DEVIDE4: library part Resistor, "Resistor"
ICL7660: "Charge Pump Switching Regulator IC Positive or Negative Fixed -Vin, 2Vin 1 Output 45mA 8-SOIC (0.154, 3.90mm Width)", Package="SOIC-8 Renesas Electronics America Inc", Check_prices=https://www.snapeda.com/parts/ICL7660CBAZ/Renesas/view-part/?ref=eda, MF="Renesas Electronics America Inc", MP=ICL7660CBAZ, SnapEDA_Link=https://www.snapeda.com/parts/ICL7660CBAZ/Renesas/view-part/?ref=snap
IRF3205: "MOSFET N-CH 400V 10A TO-220AB", ComponentLink1Description=http://www.digikey.com/products/en/discrete-semiconductor-products/19, ComponentLink1URL=http://www.digikey.com/product-detail/en/vishay-siliconix/IRF740PBF/IRF740PBF-ND/812037, ComponentLink2Description=Datasheet, ComponentLink2URL=http://www.roboeq.ir/files/id/1101/name/IRF740A.pdf, DatasheetVersion=2017-1-12, PackageDescription="MOSFET N-CH 400V 10A TO-220AB", PackageReference=TO-220AB, PackageVersion=2017-1-12, Published=2017-1-12, Publisher="Abbas Basereh"
IRLML2502_1 IRLML2502_2: "45 V, 500 mA NPN general-purpose transistors", ComponentLink1Description="Manufacturer Link", ComponentLink1URL=http://www.nxp.com/, ComponentLink2Description=Datasheet, ComponentLink2URL=http://www.nxp.com/, DatasheetVersion=2017, LatestRevisionDate=2017, LatestRevisionNote="IPC-7351 Footprint Added.", PackageDescription="3-Pin SOT-23 Package 0.95 mm Pitch, 2.3 mm Lead Span", PackageReference=SOT23, PackageVersion=2017-2-8, Published=2017-2-8, Publisher="Abbas Basereh"
IRLML6402_1 IRLML6402_2: "PNP General-purpose Transistor", ComponentLink1Description="Manufacturer Link", ComponentLink1URL=http://www.semiconductors.philips.com/, ComponentLink2Description=Datasheet, ComponentLink2URL=http://www.semiconductors.philips.com/acrobat/datasheets/BC856_BC857_BC858_6.pdf, DatasheetVersion=4-Feb-2002, LatestRevisionDate=12-Dec-2006, LatestRevisionNote="IPC-7351 Footprint Added.", PackageDescription="3-Pin SOT-23 Package 0.95 mm Pitch, 2.3 mm Lead Span", PackageReference=SOT23, PackageVersion=2017-1-6, Published=2017-1-6, Publisher="Abbas Basereh"
"j_heater bed": library part 645004114822, "WR-WTB 3.96mm Male Locking Header, 4p", ComponentLink1Description=Manufacturer, ComponentLink1URL=http://www.we-online.de, ComponentLink2Description=Datasheet, ComponentLink2URL=http://katalog.we-online.de/em/datasheet/6450xx114822.pdf, Part Number=645004114822, Pin Number=4, Pitch="3.96 mm", Published Date="June 2017", Publisher="Wurth Elektronik"
KEY1 KEY2 KEY3 "mcu reset": library part push_button
L_pp L_ppb: library part SRP6540-4R7M, "4.7 ÂµH Shielded Drum Core, Wirewound Inductor 6 A 33.5mOhm Max Nonstandard", Package="Nonstandard Bourns", Availability="In Stock", Check_prices=https://www.snapeda.com/parts/SRP6540-4R7M/Bourns/view-part/?ref=eda, MF=Bourns, MP=SRP6540-4R7M, PRICE=None, Purchase-URL=https://pricing.snapeda.com/search/part/SRP6540-4R7M/?ref=eda, SnapEDA_Link=https://www.snapeda.com/parts/SRP6540-4R7M/Bourns/view-part/?ref=snap
LED_1P LED_2P: library part LED, "LED", Adding Date=1387/12/22, Designer="Saeid Jorablo", Organazation=ControTec
lm358: "Op Amp Dual Low Power Amplifier Â±15V/30V 8-Pin SO N Tube", Package=None, Check_prices=https://www.snapeda.com/parts/LM358D/STMicroelectronics/view-part/?ref=eda, MF=STMicroelectronics, MP=LM358D, SnapEDA_Link=https://www.snapeda.com/parts/LM358D/STMicroelectronics/view-part/?ref=snap
"MOSFET GROUP1" "MOSFET GROUP2": "Header, 8-Pin", LatestRevisionDate=17-Jul-2002, LatestRevisionNote="Re-released for DXP Platform.", Publisher="Altium Limited"
oled: "Header, 7-Pin", LatestRevisionDate=17-Jul-2002, LatestRevisionNote="Re-released for DXP Platform.", Publisher="Altium Limited"
PROGRAM: library part "Header 4 PIN Telecom.", "Header, 4-Pin Telecom.", Data=16-12-2016, Designer="Abbas Basereh"
Q_FAN: "N-channel MOSFET", ComponentLink1Description="Manufacturer Link", ComponentLink2Description=Datasheet, ComponentLink2URL=http://www.roboeq.ir/files/id/2900/name/FDD6690.pdf/, DatasheetVersion=2017-1-6, Note="Pin 2 is trimmed (and not drawn) and is electrically connected to Drain", PackageDescription="D-PAK TO-252", PackageReference="D-PAK TO-252", PackageVersion=2017-1-6, Published=2017-1-6, Publisher="Abbas Basereh"
S1: "24 Pulse Incremental Mechanical Rotary Encoder w/ 6 mm Knurl Shaft,Through Hole", Package=None, Check_prices=https://www.snapeda.com/parts/PEC11R-4220K-S0024/Bourns/view-part/?ref=eda, MF=Bourns, MP=PEC11R-4220K-S0024, SnapEDA_Link=https://www.snapeda.com/parts/PEC11R-4220K-S0024/Bourns/view-part/?ref=snap
SOURCE_FEEDBACK: "WR-WTB 2.54mm Male Locking Header, 2p", ComponentLink1Description=Manufacturer, ComponentLink1URL=http://www.we-online.de, ComponentLink2Description=Datasheet, ComponentLink2URL=http://katalog.we-online.de/em/datasheet/6190xx11121.pdf, Part Number=61900211121, Pin Number=2, Pitch="2.54 mm", Published Date="June 2017", Publisher="Wurth Elektronik"
"tantal classB1" "tantal classB9": library part "Capacitor Electrolytic", "Electrolytic Capacitor"
"U_FET DRIVER1" "U_FET DRIVER2": "Half-Bridge Gate Driver IC Non-Inverting 8-SOIC", Package="SOIC-8 Infineon", Check_prices=https://www.snapeda.com/parts/IR2104STRPBF/Infineon/view-part/?ref=eda, MF="Infineon Technologies", MP=IR2104STRPBF, SnapEDA_Link=https://www.snapeda.com/parts/IR2104STRPBF/Infineon/view-part/?ref=snap
U_vo1 U_vo2: "Buck Switching Regulator IC Positive Adjustable 0.8V 1 Output 3A 8-SOIC (0.154, 3.90mm Width) Exposed Pad", Package="SOIC-8 Monolithic Power", Check_prices=https://www.snapeda.com/parts/MP1584EN/Monolithic+Power+Systems/view-part/?ref=eda, MF="Monolithic Power", MP=MP1584EN, SnapEDA_Link=https://www.snapeda.com/parts/MP1584EN/Monolithic+Power+Systems/view-part/?ref=snap
UMCC1: "ARMÂ® CortexÂ®-M3 STM32F1 Microcontroller IC 32-Bit 72MHz 512KB (512K x 8) FLASH 64-LQFP (10x10)", Package="LQFP-64 STMicroelectronics", Check_prices=https://www.snapeda.com/parts/STM32F103RET6/STMicroelectronics/view-part/?ref=eda, MF=STMicroelectronics, MP=STM32F103RET6, SnapEDA_Link=https://www.snapeda.com/parts/STM32F103RET6/STMicroelectronics/view-part/?ref=snap
Xmt: library part OSC_25M_NZ2520SB, "Oscillator 25.00Mhz, -+50PPM, 3.3V, Temp -55 to +125°C", Manuf_1=NDK, Manuf_2="AVX Corp/Kyocera Corp", Manuf_Part_1="NZ2520SB 25MHz END4869B", Manuf_Part_2=KC2520B25.0000C10E00, ECCN_US/EU=EAR99/NEC, Provided=ST, Ref St=9157031
XX_ADS1115: library part ADS1115, Package="TFSOP-10 Texas Instruments", Availability="Not in stock", Check_prices=https://www.snapeda.com/parts/ADS1115/Texas%20Instruments/view-part/6620382/?ref=eda, MF="Texas Instruments", MP=ADS1115, PRICE=None, SnapEDA_Link=https://www.snapeda.com/parts/ADS1115/Texas%20Instruments/view-part/6620382/?ref=snap

## Free pads (board coordinates)
  round 3 hole 3: ""(91.101,100.594) ""(151.101,100.594)
  round 1.5 smd: ""(115.85,75.66)

## Via types
v1: diameter 1, hole 0.5, Top Layer to Bottom Layer, 115 vias

## Nets (pads, with @x,y where several pads share a name; then routed paths per layer and width w, separated by ;. In a path a pad name is that pad's centre, name@x,y a point inside that pad or via, vN(x,y) a via of type N, cw(c..) or ccw(c..) an arc to the next point about the centre after c; other vN are vias at no path point)
+3.3V: "Ferrit  1.2" "I2C SCK.2" "I2C SDA.2" "tantal classB1.2" C_LK2.2 C_LL1.1 C_LL2.1 C_reh1.1 CLM2.2 CXT.1 DS18B20A.3 DS18B20B.3 DS18B20C.3 L_pp.2 oled.2 PWL1.1 PWL2.1 PWL3.1 R_ADDR2.1 R_Alert.2 R_feeedback1.1 R_KEYT1.2 R_KEYT2.2 R_KEYT3.2 R_PL1.1 R_PL4.1 R_PL5.1 R_Reset1.2 R_SCL.1 R_SDA.1 R_XT1.1 RTW1.1 RTW2.2 RTW4.1 RTW5.2 Xmt.4 | length 439.4
  Top Layer w0.3: RTW2.2@71.66,78.67 71.78,78.67 71.78,78.685 RTW2.2@71.66,78.685 ; R_Reset1.2@99.404,93 99.404,92.436 ccw(c99.94,92.436) 99.94,91.9 105.7,91.9 cw(c105.7,91.05) 106.55,91.05 v1(106.55,90.259) ; 106.55,82.1 ccw(c106.647,82.197) 106.647,82.06 107.036,82.06 ; 106.7,81.67 cw(c107.09,81.67) 107.09,82.06 ; 106.7,82.45 ccw(c107.09,82.45) 107.063,82.061 ; R_XT1.1@107.426,83.06 107.426,82.45 ; CXT.1@110.666,83.06 109.89,82.285 cw(c109.348,82.827) 109.348,82.06 107.815,82.06 ; v1(117.235,68.06) 118.38,68.06 cw(c118.38,67.23) 119.21,67.23 119.21,61.14 ccw(c120.58,61.14) 120.58,59.77 125.37,59.77 cw(c125.37,58.466) 126.292,59.388 126.755,58.925 ccw(c127.513,59.683) 127.513,58.611 v1(128.07,58.611) ; R_KEYT2.2@134.458,70.375 v1(134.458,71.46) ; R_KEYT3.2@139.7,70.42 140.75,70.42 cw(c140.75,70.06) 141.11,70.06 v1(141.11,69.61) 141.11,68.725 ccw(c141.725,68.725) 141.29,68.29 141.688,67.892 cw(c141.057,67.26) 141.95,67.26 141.95,66.26 ccw(c142.42,66.26) 142.42,65.79 144.31,65.79 cw(c144.31,65.37) 144.73,65.37 R_KEYT1.2@144.73,64.638 ; 107.036,82.06 ccw(c107.036,82.45) 107.063,82.061 ; 107.036,82.06 107.09,82.06 ; 107.063,82.061 ccw(c107.036,82.45) 107.426,82.45 ; 107.063,82.061 ccw(c107.09,82.45) 107.09,82.06 ; 107.09,82.06 107.815,82.06 ; 107.426,82.45 ccw(c107.815,82.45) 107.815,82.06
  Top Layer w0.6: 60.788,57.808 DS18B20A.3@61.691,56.906 ; 60.788,57.809 cw(c61.508,58.528) 60.49,58.528 60.49,78.9 cw(c61.49,78.9) 61.49,79.9 64.05,79.9 cw(c64.05,78.693) 64.903,79.547 ccw(c65.957,80.6) 65.957,79.11 69.711,79.11 RTW1.1@70.136,78.685 RTW2.2@71.66,78.685 ; DS18B20B.3@70.796,56.906 70.796,61.346 ; RTW4.1@71.71,68.536 70.998,67.824 ccw(c71.485,67.337) 70.796,67.337 RTW5.2@70.796,66.76 70.796,63.174 ; CLM2.2@77.18,68.65 77.18,67.95 ccw(c77.85,67.95) 77.85,67.28 79.67,67.28 ccw(c79.67,67.94) 80.33,67.94 80.33,68.603 ccw(c80.283,68.603) R_SDA.1@80.283,68.65 81.206,68.65 cw(c81.206,67.916) 81.725,68.435 82.888,67.272 cw(c82.423,66.808) 83.08,66.808 83.08,63.51 ; R_SCL.1@79.883,71.611 v1(85.18,71.611) ; R_Alert.2@79.883,78.444 84.016,78.444 cw(c84.016,77.7) 84.76,77.7 84.76,74.93 cw(c84.156,74.93) 84.156,74.326 C_LK2.2@83.55,74.326 82.345,74.326 ccw(c82.345,73.83) R_ADDR2.1@81.994,74.18 81.994,72.26 ; 81.306,71.616 ccw(c81.306,72.3) 81.99,72.3 ccw(c82.674,72.3) 82.674,71.616 ; 82.03,73.495 82.354,73.806 82.77,74.205 ; v1(103.6,81.06) 96.87,81.06 ccw(c96.87,79.78) 95.59,79.78 oled.2@95.59,78.26 95.59,75.26 ccw(c96.678,75.26) 96.678,74.172 98.13,74.172 100.67,74.172 v1(104.31,74.172) ; v1(106.55,81.06) 106.55,82.1 106.55,89.39 ; v1(106.55,90.259) 106.55,89.39 ; 107.22,90.06 ccw(c107.22,89.39) 106.55,89.39 ; v1(117.235,68.06) 114.912,68.06 ccw(c114.912,65.52) 113.116,67.316 109.119,63.319 cw(c106.562,65.877) 106.562,62.26 84.33,62.26 ; C_LL2.1@142.75,77.76 143.885,78.895 144.68,78.895 ; 143.674,79.187 cw(c142.457,79.187) 143.317,78.327 cw(c144.177,77.467) 144.177,78.684 ; L_pp.2@149.885,77.545 150.455,76.975 cw(c150.03,76.551) 150.63,76.551 ; v1(150.63,75.97) 150.63,76.551 ; L_pp.2@151.4,77.57 150.805,76.975 ccw(c151.23,76.551) 150.63,76.551 ; C_reh1.1@162.04,67.332 162.74,67.332 ccw(c162.74,67.932) 163.34,67.932 163.34,69.223 ccw(c162.74,69.221) 162.74,69.821 R_feeedback1.1@162.04,69.821 v1(162.04,72.755) ; 70.796,61.346 cw(c71.71,61.346) 71.71,62.26 ; 70.796,61.346 70.796,63.174 ; 70.796,63.174 ccw(c71.71,63.174) 71.71,62.26 ; 71.71,62.26 81.83,62.26 ; 81.83,62.26 ccw(c81.83,63.51) 83.08,63.51 ; 81.83,62.26 84.33,62.26 ; 83.08,63.51 ccw(c84.33,63.51) 84.33,62.26
  Top Layer w1: DS18B20A.3@61.691,56.906 61.691,55.189 ccw(c63.02,55.189) 63.02,53.86 78.72,53.86 ccw(c78.72,55.041) 79.901,55.041 DS18B20C.3@79.901,56.906 ; 69.615,53.86 ccw(c69.615,55.041) 70.796,55.041 ; DS18B20B.3@70.796,56.906 70.796,55.041 ; 71.977,53.86 cw(c71.977,55.041) 70.796,55.041 ; v1(106.55,90.259) Xmt.4@108.67,90.259 ; v1(142.32,74.52) 143.11,74.52 144.225,75.635 144.68,75.635 ; 143.554,78.179 144.997,76.736 ; 146.499,78.399 ccw(c146.499,79.44) 147.54,79.44 ccw(c148.581,79.44) 147.541,79.387 ; 147.541,78.525 147.541,79.387 ; v1@147.541,81.428 147.541,79.387 ; 147.551,79.57 ccw(c148.591,79.623) 148.591,78.582 ; 148.581,78.399 cw(c148.581,79.44) 147.541,79.387
  Top Layer w1.5: 144.273,79.301 cw(c144.273,78.895) 144.68,78.895 ; 144.67,75.9 146.481,77.711 cw(c147.541,76.65) 147.541,78.15 ; 145.29,78.589 ccw(c146.35,79.65) 146.34,78.15 ; 145.997,78.15 146.34,78.15 ; 146.35,78.15 cw(c146.35,79.65) 146.34,78.15 ; 146.856,77.97 L_pp.2@149.944,77.97 ; 147.816,78.33 L_pp.2@150.904,78.33 ; L_pp.2@150.63,78.15 147.541,78.15 ; 146.34,78.15 147.541,78.15
  Bottom Layer w0.3: R_PL1.1@116.88,56.454 118.324,56.454 ccw(c118.324,57.34) 119.21,57.34 119.21,67.24 ccw(c118.39,67.24) 118.39,68.06 v1(117.235,68.06) ; R_PL4.1@128.07,57.804 v1(128.07,58.611) ; v1(134.458,71.46) 134.458,70.412 ccw(c135.26,70.412) 135.26,69.61 v1(141.11,69.61)
  Bottom Layer w0.6: DS18B20A.3@61.691,56.906 PWL1.1@61.691,59.746 ; DS18B20B.3@70.796,56.906 PWL2.1@70.796,59.746 ; DS18B20C.3@79.901,56.906 PWL3.1@79.901,59.746 ; v1(85.18,71.611) 85.18,73.908 cw(c86.662,73.908) 86.662,75.39 89.929,75.39 cw(c89.929,73.311) 91.398,74.782 ; 91.399,74.781 ccw(c92.869,76.251) 92.869,74.172 v1(104.31,74.172) 114.01,74.172 cw(c114.01,72.906) 115.276,72.906 R_PL5.1@115.276,69.71 115.276,68.624 ccw(c115.84,68.624) 115.84,68.06 v1(117.235,68.06) ; v1(103.6,81.06) v1(106.55,81.06) ; C_LL1.1@152.33,75.13 152.33,75.47 ccw(c151.83,75.47) 151.83,75.97 v1(150.63,75.97) 150.63,73.714 ccw(c151.589,73.714) 151.589,72.755 v1(162.04,72.755)
  Bottom Layer w1: v1(106.55,90.259) 124.132,90.259 ccw(c124.132,91.625) 125.098,90.659 128.035,93.595 cw(c129.711,91.919) 128.035,93.596 cw(c129.711,91.919) 129.711,94.29 141.48,94.29 cw(c141.48,93.09) 142.68,93.09 142.68,89.306 ccw(c144.079,89.306) 143.147,88.263 146.926,84.484 cw(c145.772,83.135) 147.543,83.019 v1(147.543,81.43) ; v1(141.11,69.61) 141.11,72.795 cw(c142.353,72.795) 141.474,73.674 v1(142.32,74.52)
+5V: "ADS1115 conector.1" "tantal classB9.2" C_rehc.1 CLOP1.2 L_ppb.2 R_feeedbackv.1 | length 169.3
  Top Layer w0.6: v1(88.21,81.41) 88.21,81.42 91.52,81.42 ccw(c91.52,82.23) 92.33,82.23 CLOP1.2@92.33,83.54 ; C_rehc.1@142.14,90.25 142.83,90.25 cw(c142.83,89.284) 143.513,89.967 144.68,88.8 ; L_ppb.2@149.561,90.392 cw(c149.561,89.307) v1@150.63,89.49 ; v1(150.63,88.99) v1@150.63,89.49 ; L_ppb.2@150.63,91.015 v1@150.63,89.49 ; L_ppb.2@151.699,90.392 ccw(c151.699,89.307) v1@150.63,89.49 ; R_feeedbackv.1@164.229,91.015 v1(164.229,91.85)
  Top Layer w1.5: 144.68,88.8 146.26,88.8 148.475,91.015 L_ppb.2@150.63,91.015
  Bottom Layer w0.6: 63.179,65.544 69.93,65.544 cw(c69.93,64.275) 70.827,65.173 ; 70.827,65.173 72.55,63.45 ccw(c73.564,64.464) 73.564,63.03 82.52,63.03 ccw(c82.52,64.54) 84.03,64.54 84.03,80.43 ; v1(88.21,81.41) 85.01,81.41 ; 106.182,96.74 ccw(c106.184,95.187) 105.085,96.285 100.414,91.614 cw(c98.617,93.411) 98.617,90.87 85.026,90.87 ccw(c85.026,89.874) 84.03,89.874 84.03,82.39 ; 106.184,96.74 106.66,96.74 144.38,96.74 cw(c144.38,95.2) 145.92,95.2 145.92,90.33 ccw(c147.26,90.33) 147.26,88.99 v1(150.63,88.99) 150.63,91.67 cw(c151.85,91.67) 151.85,92.89 162.775,92.89 cw(c162.775,91.893) 163.481,92.598 v1(164.229,91.85) ; 84.03,80.43 cw(c85.01,80.43) 85.01,81.41 ; 84.03,80.43 84.03,82.39 ; 84.03,82.39 ccw(c85.01,82.39) 85.01,81.41
+12V: "DC JACK.1" "Elko E_1.2" "j_heater bed.1" "j_heater bed.3" "U_FET DRIVER1.1" "U_FET DRIVER2.1" C_PREG2.2 C_PREG3.2 C_PREG4.2 CIP1.1 CIP2.1 DPN1.1 DPN2.1 IRLML6402_1.2 IRLML6402_2.2 Rrery1.1 Rrery5.1 U_vo1.7 U_vo2.7 | length 282.9
  Top Layer w0.6: v1(102.36,99.53) 102.36,97.82 ccw(c103.31,97.82) 103.31,96.87 105.486,96.87 106.91,96.87 ccw(c106.91,98.125) 107.797,97.237 107.987,97.427 cw(c108.984,96.43) 108.984,97.84 115.86,97.84 cw(c115.86,96.222) 117.004,97.366 118.7,95.67 DPN2.1@119.02,95.67 ; v1(110.61,103.34) 133.22,103.34 cw(c133.22,102.1) 134.46,102.1 134.46,99.33 cw(c133.56,99.33) 133.56,98.43 132.07,98.43 ccw(c132.07,97.223) 131.217,98.077 DPN1.1@130.01,96.87 ; CIP1.1@126.25,94.97 128.96,94.97 ; DPN1.1@129.71,96.87 129.71,95.72 ; 137.29,96.55 v1(136.41,95.67) 136.028,95.288 cw(c135.26,96.056) 135.26,94.97 130.46,94.97 ; 137.291,96.551 cw(c138.063,95.777) 138.063,96.87 138.606,96.87 139.44,96.87 ; v1(144.45,90.98) 145.325,90.98 ccw(c145.325,92.465) 146.375,91.415 147.25,92.29 ; 147.25,92.29 cw(c148.24,91.3) 148.24,92.7 157.36,92.7 cw(c157.36,92.015) 158.045,92.015 U_vo2.7@158.045,89.895 ; 154.21,80.18 ccw(c154.738,80.18) 154.738,79.652 ; v1(154.21,81.83) 154.21,80.28 ccw(c154.738,80.28) 154.738,79.752 155.627,79.752 ; 154.433,79.752 cw(c154.43,79.152) 155.03,79.154 ; Rrery1.1@155.03,78.594 155.03,79.154 ; Rrery5.1@155.414,92.242 155.774,92.602 ; U_vo1.7@158.045,76.73 158.045,78.805 ccw(c157.098,78.805) 157.098,79.752 156.538,79.752 155.627,79.752 ; 128.96,94.97 ccw(c128.96,95.72) 129.71,95.72 ; 128.96,94.97 130.46,94.97 ; 129.71,95.72 ccw(c130.46,95.72) 130.46,94.97 ; 155.03,79.154 cw(c155.63,79.152) 155.627,79.752
  Top Layer w3: 158.4,63.7 164.15,63.7 167.15,66.7 167.6,66.7 168,66.7 168.4,66.7 168.8,66.7 169.2,66.7
  Bottom Layer w0.6: v1(102.36,99.53) 110.86,99.53 ccw(c110.86,100.24) 111.57,100.24 IRLML6402_2.2@111.57,101.24 111.57,101.47 110.804,102.236 cw(c111.271,102.704) 110.61,102.704 v1(110.61,103.34) ; v1(136.41,95.67) 143.41,95.67 cw(c143.41,94.63) 144.45,94.63 v1(144.45,90.98) 144.45,89.78 ccw(c145.778,89.78) 144.839,88.841 148.77,84.91 cw(c147.393,83.534) 149.34,83.534 149.34,81.33 ccw(c150.11,81.33) 150.11,80.56 153.69,80.56 ccw(c153.69,81.08) 154.21,81.08 v1(154.21,81.83) 158.43,81.83 ccw(c158.43,82.72) 159.32,82.72 159.32,89.28 cw(c160.78,89.28) 160.78,90.74 166.83,90.74 cw(c166.83,89.9) 167.67,89.9 167.67,84.998 ; IRLML6402_1.2@140.99,67.72 142.7,67.72 ccw(c142.7,69.024) 143.621,68.101 145.455,69.935 cw(c146.264,69.126) 146.264,70.27 ; 147.04,69.43 147.04,69.494 ccw(c146.264,69.494) 146.264,70.27 ; 148.24,68.62 148.39,68.77 148.39,69.52 ccw(c147.64,69.52) 147.64,70.27 146.264,70.27 ; 167.098,84.438 ccw(c167.11,84.998) 167.67,84.996 ; 167.67,85 ccw(c168.23,85) 167.67,84.998 ; 168.242,84.44 cw(c168.23,85) 167.67,84.996 ; 168.4,83.24 167.67,83.97 167.67,84.996 ; 167.67,84.996 167.67,84.998
  Bottom Layer w1: C_PREG4.2@147.24,61.23 C_PREG2.2@147.24,63.7 C_PREG3.2@147.24,66.4 147.24,66.775 147.24,67.62 cw(c148.24,67.62) 148.24,68.62 151.97,68.62 cw(c151.97,67.16) 153.43,67.16 153.43,55.66 ccw(c155.47,55.66) 155.47,53.62 169.192,53.62 ccw(c169.187,55.723) 171.29,55.723 171.29,61.186 171.29,61.188 ccw(c170.29,61.186) 170.998,61.892 169.628,63.262 168.685,64.205 168.21,64.68 167.295,65.595 166.952,65.938 ; 167.6,66.7 168.4,65.9 168.598,65.702 ; 168.32,64.79 168.32,65.69
  Bottom Layer w1.5: C_PREG4.2@147.24,61 C_PREG4.2@147.24,61.23
  Bottom Layer w3: 164.69,77.29 ccw(c166.66,77.29) 166.66,75.32 168.4,75.32 169.3,75.32 cw(c169.3,72.32) 172.3,72.324 172.3,70.55 cw(c168.373,70.55) 169.146,66.7 ; 164.69,77.862 164.69,81.27 cw(c166.66,81.27) 166.66,83.24 168.4,83.24 ; 168,66.7 168.4,66.7 ; 168.8,66.7 169.146,66.7 ; 169.2,66.7 169.146,66.7
+24V: "MOSFET GROUP2.5"
A_GND_ANALOG: C_ICL2.2 C_ICL3.2 C_LO1.2 C_LO2.2 C_LO3.2 C_LO5.2 C_LOB.2 CLOP2.1 ICL7660.3 | length 47.6
  Top Layer w0.4: v1(65.21,80.82) 65.847,80.183 ccw(c66.477,80.812) 66.477,79.922 C_LOB.2@71.43,79.922 ; C_LO3.2@69.02,89.816 69.464,90.26 ; 69.034,90.264 v1(70.05,90.264)
  Top Layer w0.6: v1@74.04,88.595 ICL7660.3@75.716,88.595 ICL7660.3@76.53,88.595
  Bottom Layer w0.4: v1(65.21,80.82) 65.77,80.82 ccw(c65.77,81.38) 66.33,81.38 66.33,87.735 cw(c67.767,87.735) 66.751,88.751 ; 66.751,88.751 67.818,89.818 ccw(c66.97,90.667) 68.17,90.667 CLOP2.1@68.17,92.12
  Bottom Layer w0.6: CLOP2.1@68.17,92.12 69.22,92.12 ; C_LO5.2@69.295,96.895 69.854,96.336 cw(c69.382,95.863) 70.05,95.863 70.05,92.95 ; C_LO1.2@70.05,85.039 C_LO2.2@70.05,86.399 70.05,87.67 ; C_ICL2.2@75.085,87.325 C_ICL3.2@75.085,88.595 v1(73.84,88.595) 70.975,88.595 ; 69.22,92.12 cw(c69.22,91.29) 70.05,91.29 ; 69.22,92.12 ccw(c69.22,92.95) 70.05,92.95 ; 70.05,87.67 cw(c70.975,87.67) 70.975,88.595 ; 70.05,87.67 70.05,89.52 ; 70.05,89.52 ccw(c70.975,89.52) 70.975,88.595 ; 70.05,89.52 v1(70.05,90.264) 70.05,91.29 ; 70.05,91.29 70.05,92.95
ADGND: C_LK1.1 CLM1.1 XX_ADS1115.3 | length 7.3
  Top Layer w0.3: CLM1.1@76.104,78.59 XX_ADS1115.3@76.104,75.711 76.104,74.806 ccw(c76.627,74.806) 76.627,74.283 C_LK1.1@79.344,74.283